# Allegro board AX615D_DEMO_V1_3.BRD
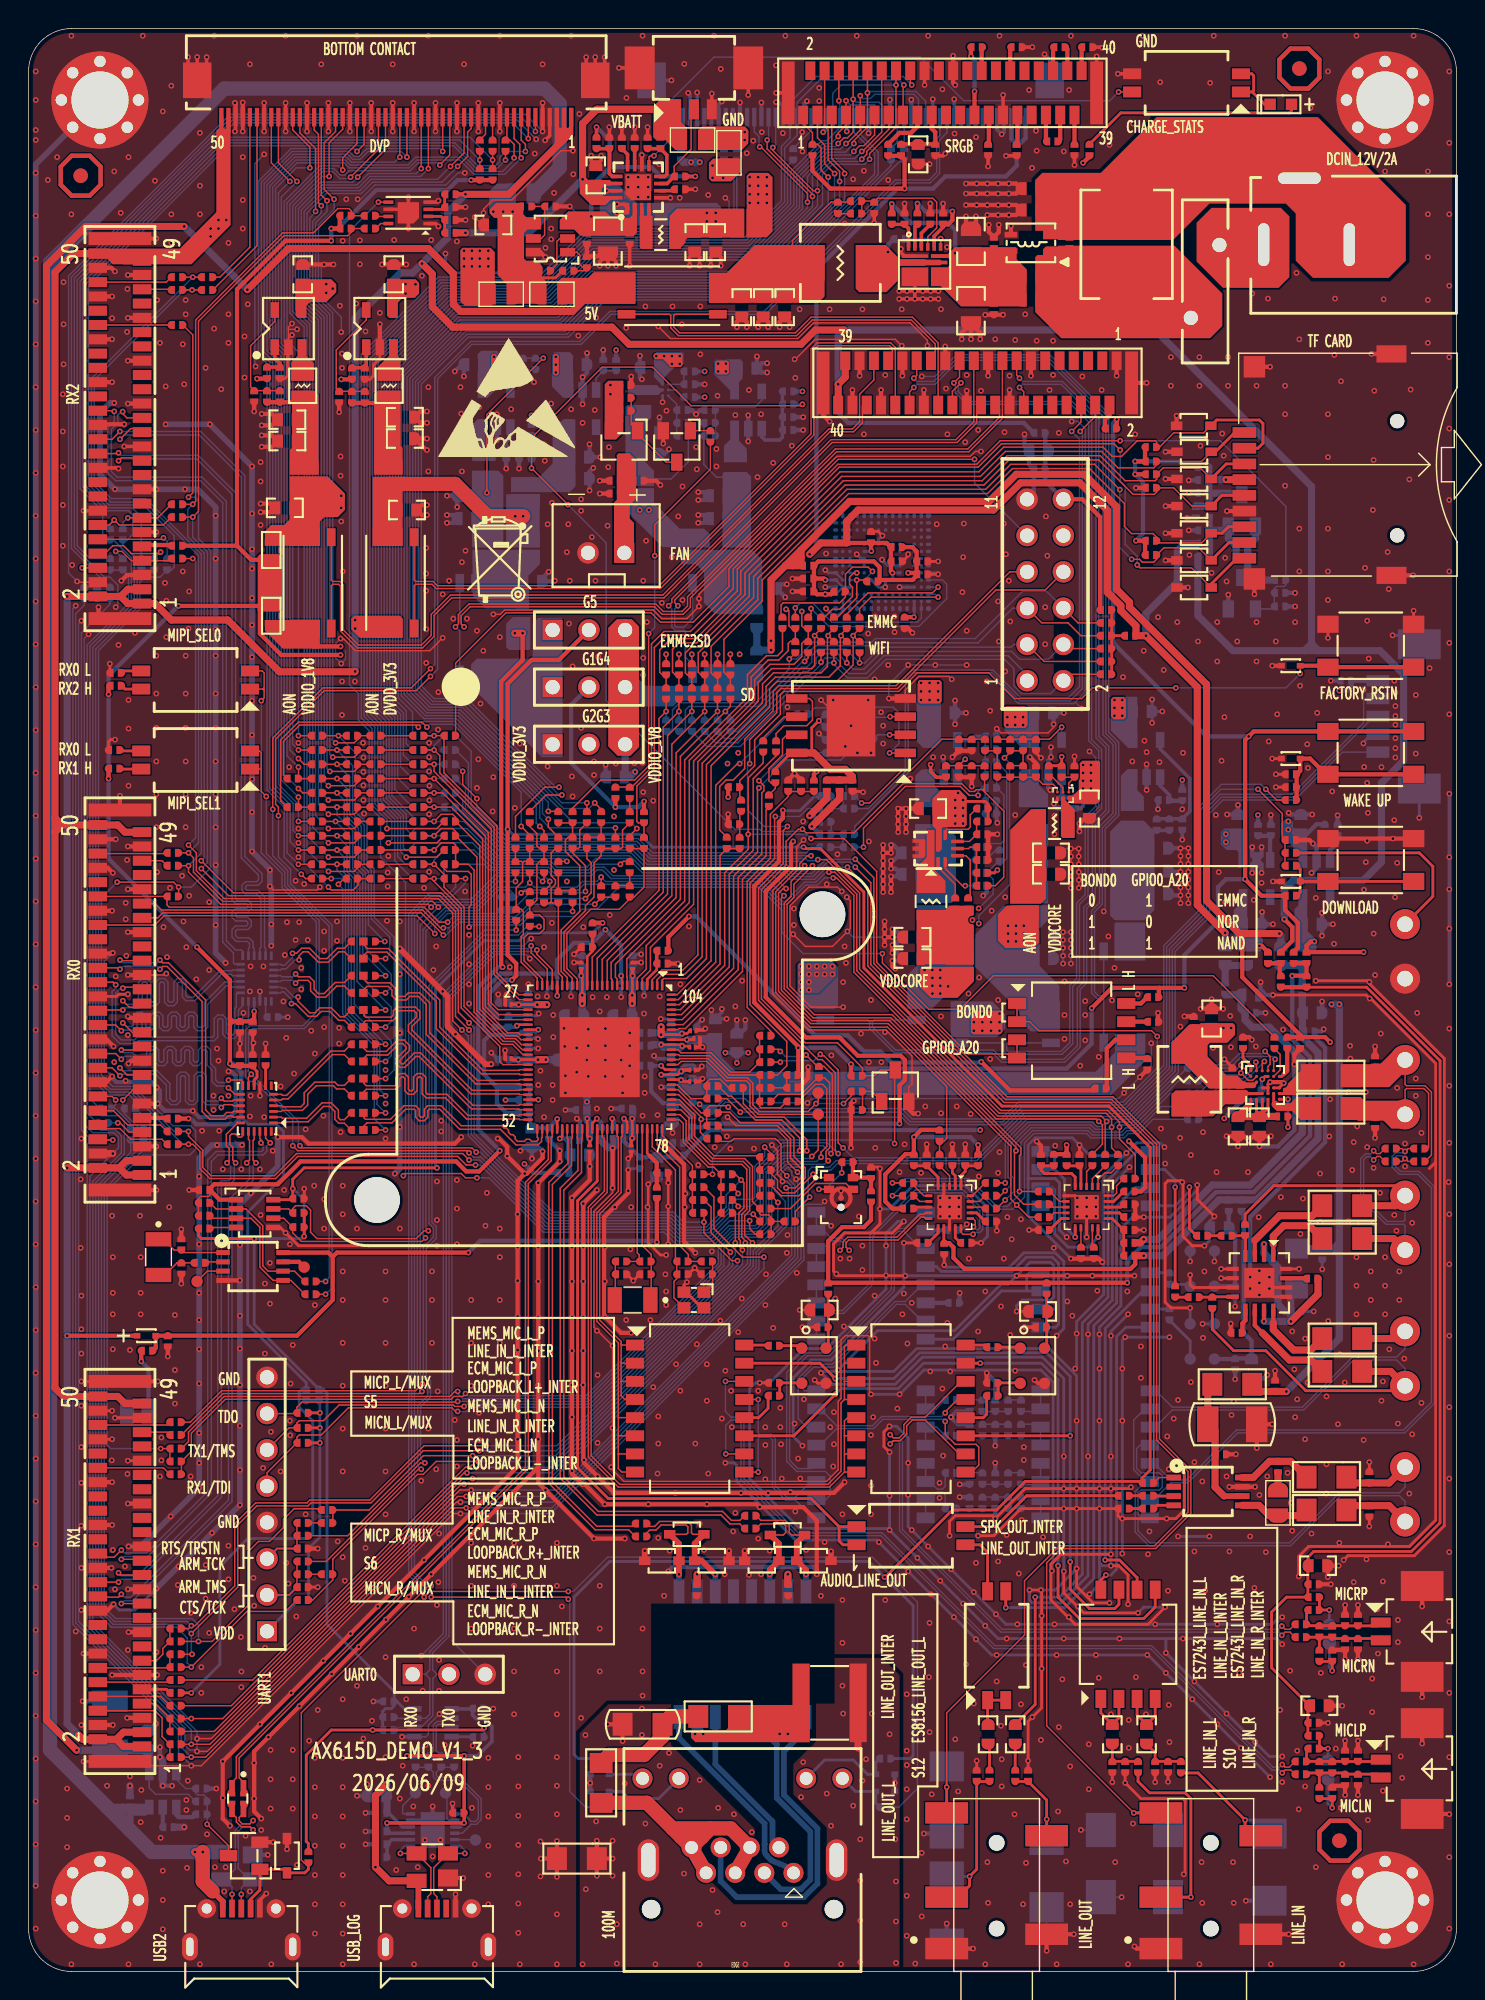
[diagram p0: board, top side]
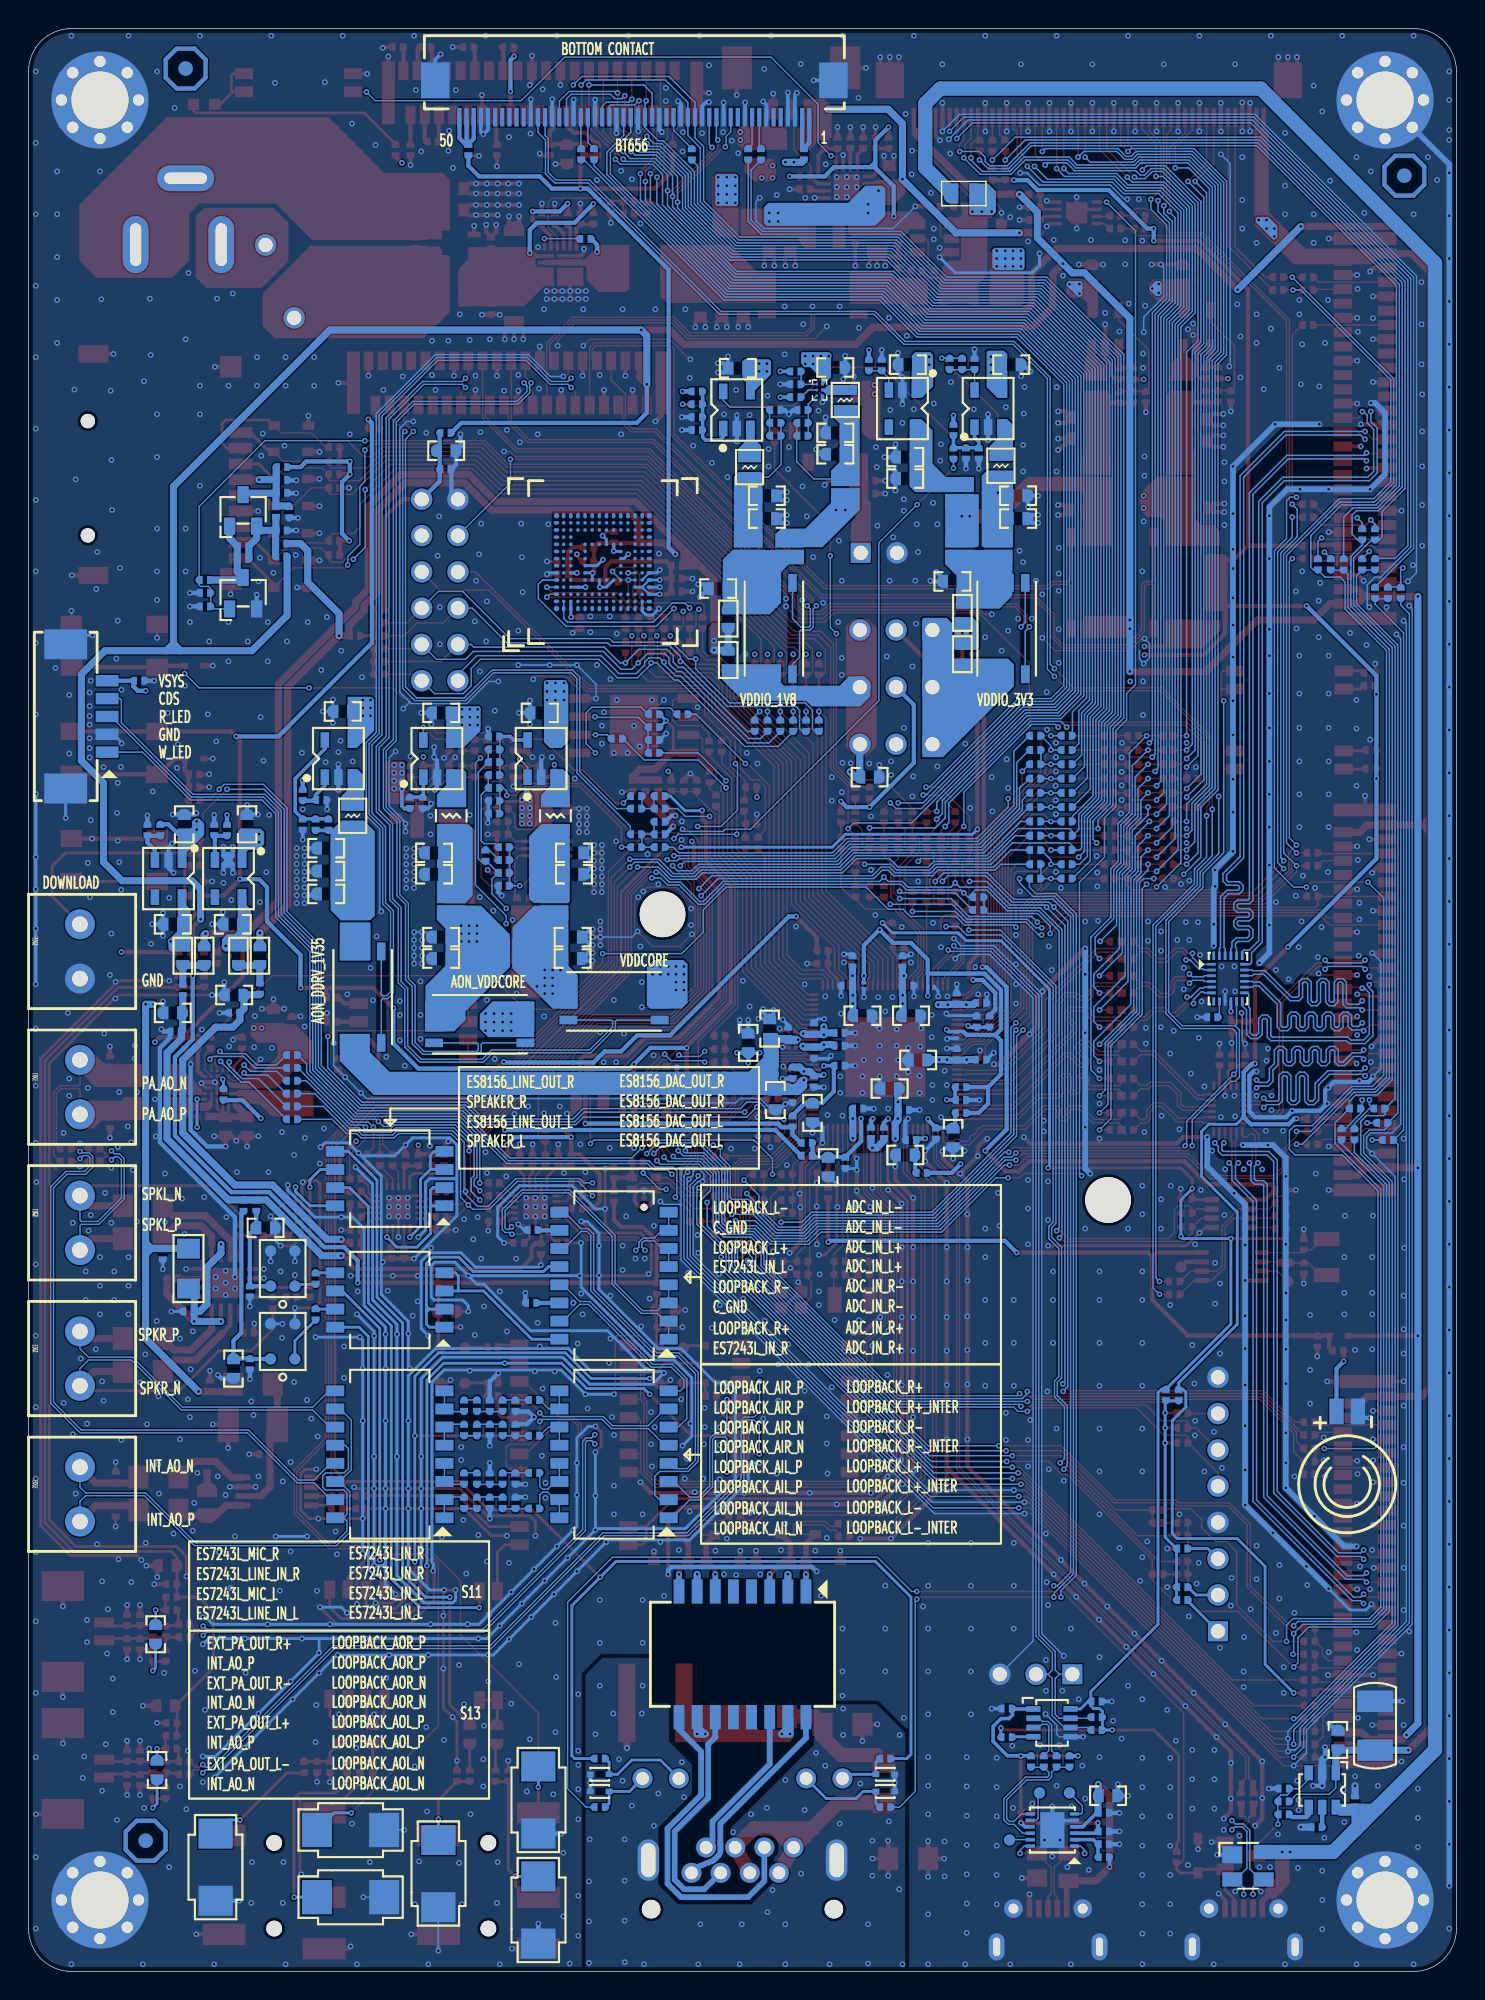
[diagram p1: board, bottom side, seen from below]

Outline 100 x 136 mm; copper layers: TOP, L2, L3, BOTTOM. Coordinates in mm from the lower left corner of the outline.
Outline path: 0,133 0,3 arc(0.88,0.88) 3,0 97,0 arc(99.12,0.88) 100,3 100,133 arc(99.12,135.12) 97,136 3,136 arc(0.88,135.12) 0,133

## Design rules (mm)
constraint set DEFAULT: min track width 0.1, pair gap 0.1
net group ADC_IN_L: nets ADC_IN_L+ ADC_IN_L-
net group ADC_IN_R: nets ADC_IN_R+ ADC_IN_R-
net group CH0_AON_VDDIO_1V8_V: nets CH0_AON_VDDIO_1V8_V+ CH0_AON_VDDIO_1V8_V-
net group CH1_AON_VDDIO_3V3_V: nets CH1_AON_VDDIO_3V3_V+ CH1_AON_VDDIO_3V3_V-
net group CH2_AON_DDRV_1V35_V: nets CH2_AON_DDRV_1V35_1V5_V+ CH2_AON_DDRV_1V35_1V5_V-
net group CH3_DVDD_MAIN_V: nets CH3_DVDD_MAIN_V+ CH3_DVDD_MAIN_V-
net group CH4_AON_VDDCORE_V: nets CH4_AON_VDDCORE_V+ CH4_AON_VDDCORE_V-
net group CH5_VDDIO_1V8_V: nets CH5_VDDIO_1V8_V+ CH5_VDDIO_1V8_V-
net group CH6_VDDIO_3V3_V: nets CH6_VDDIO_3V3_V+ CH6_VDDIO_3V3_V-
net group CH7_VDDCORE_V: nets CH7_VDDCORE_V+ CH7_VDDCORE_V-
net group DP5: nets USB_DM USB_DP
net group DP6: nets USB_DM_J USB_DP_J
net group DP7: nets USB_LOG_DM USB_LOG_DP
net group DRX: nets DRX+ DRX-
net group DTX: nets DTX+ DTX-
net group ECM_MIC_L: nets ECM_MIC_L_N ECM_MIC_L_P
net group ECM_MIC_R: nets ECM_MIC_R_N ECM_MIC_R_P
net group EPHY_RXN: nets EPHY_RXN N30393159
net group EPHY_RXP: nets EPHY_RXP N30393142
net group EPHY_TXN: nets EPHY_TXN N30393097
net group EPHY_TXP: nets EPHY_TXP N30393080
net group EXT_PA_OUT_L: nets EXT_PA_OUT_L+ EXT_PA_OUT_L-
net group EXT_PA_OUT_R: nets EXT_PA_OUT_R+ EXT_PA_OUT_R-
net group INT_AO: nets INT_AO_N INT_AO_P
net group LOOPBACK_AIL: nets LOOPBACK_AIL_N LOOPBACK_AIL_P
net group LOOPBACK_AIR: nets LOOPBACK_AIR_N LOOPBACK_AIR_P
net group LOOPBACK_AOL: nets LOOPBACK_AOL_N LOOPBACK_AOL_P
net group LOOPBACK_AOR: nets LOOPBACK_AOR_N LOOPBACK_AOR_P
net group LOOPBACK_L: nets LOOPBACK_L+ LOOPBACK_L-
net group LOOPBACK_L_INTER: nets LOOPBACK_L+_INTER LOOPBACK_L-_INTER
net group LOOPBACK_R: nets LOOPBACK_R+ LOOPBACK_R-
net group LOOPBACK_R_INTER: nets LOOPBACK_R+_INTER LOOPBACK_R-_INTER
net group MEMS_MIC_L: nets MEMS_MIC_L_N MEMS_MIC_L_P
net group MEMS_MIC_R: nets MEMS_MIC_R_N MEMS_MIC_R_P
net group MIPI_RX_CD0: nets MIPI_RX_CD0_N MIPI_RX_CD0_P
net group MIPI_RX_CD1: nets MIPI_RX_CD1_N MIPI_RX_CD1_P
net group MIPI_RX_CD2: nets MIPI_RX_CD2_N MIPI_RX_CD2_P
net group MIPI_RX_CD3: nets MIPI_RX_CD3_N MIPI_RX_CD3_P
net group MIPI_RX_CD4: nets MIPI_RX_CD4_N MIPI_RX_CD4_P
net group MIPI_RX_CD5: nets MIPI_RX_CD5_N MIPI_RX_CD5_P
net group SMART_PA_AO: nets SMART_PA_AO_N SMART_PA_AO_P
net group USB_LOG: nets USB_LOG_RXD USB_LOG_TXD
net group MG1: nets RX_CD0_N RX_CD0_P RX_CD1_N RX_CD1_P RX_CD2_N RX_CD2_P RX_CD3_N RX_CD3_P RX_CD4_N RX_CD4_P RX_CD5_N RX_CD5_P
net group MG2: nets MIPI_2LANE_CD0_N MIPI_2LANE_CD0_P MIPI_2LANE_CD1_N MIPI_2LANE_CD1_P MIPI_2LANE_CLK0_N MIPI_2LANE_CLK0_P
net group MG3: nets MIPI_2X2LANE_CLK_N MIPI_2X2LANE_CLK_P MIPI_4LANE/2LANE_CD0_N MIPI_4LANE/2LANE_CD0_P MIPI_4LANE/2LANE_CD1_N MIPI_4LANE/2LANE_CD1_P MIPI_4LANE/2LANE_CLK_N MIPI_4LANE/2LANE_CLK_P MIPI_4LANE_CD2_N MIPI_4LANE_CD2_P MIPI_4LANE_CD3_N MIPI_4LANE_CD3_P
net group MG4: nets MIPI_2LANE_CD2_N MIPI_2LANE_CD2_P MIPI_2LANE_CD3_N MIPI_2LANE_CD3_P MIPI_2LANE_CLK1_N MIPI_2LANE_CLK1_P

## Placement (name value [footprint] x y rotation side)
C3  1uF/10V  [C0402S]  44.4 55.9 0 top
C4  18pF/50V  [C0402S]  43.2 48.8 0 top
C5  12pF/50V  [C0402S]  47.5 48.8 0 top
C6  1uF/10V  [C0402S]  9.75 44.1 270 top
C7  18pF/50V  [C0402S]  41.5 48.8 180 top
C8  12pF/50V  [C0402S]  45.8 48.8 180 top
C9  18pF/50V  [C0402S]  10.7 50.9 270 top
C11  18pF/50V  [C0402S]  10.7 49.2 90 top
C12  1uF/10V  [C0402S]  88.4 83.8 180 top
C13  100nF/16V  [C0402S]  12.3 54.7 180 top
C14  100nF/16V  [C0402S]  18.9 54.1 0 top
C15  1uF/10V  [C0402S]  88.4 79.2 0 top
C16  1uF/10V  [C0402S]  39.1 71.7 180 top
C18  2.2uF/6.3V  [C0402S]  82.28 100.88 180 bottom
C19  100nF/16V  [C0402S]  84.97 99.78 0 bottom
C21  2.2uF/6.3V  [C0402S]  82.25 103.5 180 bottom
C24  100nF/16V  [C0402S]  82.25 104.4 180 bottom
C25  100nF/16V  [C0402S]  87.65 95.55 0 bottom
C26  NC/10pF/50V  [C0402S]  78.6 103.85 180 top
C28  2.2uF/6.3V  [C0402S]  57.7 83 270 top
C29  1uF/10V  [C0402S]  44.4 70.55 0 top
C30  100nF/16V  [C0402S]  62.6 97.8 0 top
C31  100nF/16V  [C0402S]  54.6 96.6 180 top
C32  100nF/16V  [C0402S]  54.6 97.5 180 top
C33  2.2uF/6.3V  [C0402S]  62.6 98.7 0 top
C34  100nF/16V  [C0402S]  59 100.4 90 top
C35  2.2uF/6.3V  [C0402S]  60.8 98.7 0 top
C36  1uF/10V  [C0402S]  61.35 94.4 270 top
C39  NC/100uF/10V  [C1210]  5.7 17.2 90 bottom
C40  10uF/10V  [C0603S]  8.3 16.2 90 bottom
C41  1uF/10V  [C0402S]  7.1 11.9 90 bottom
C42  1uF/10V  [C0402S]  12.1 12.8 0 bottom
C43  100nF/16V  [C0402S]  38.2 58.2 0 bottom
C44  10uF/10V  [C0603S]  38.6 57.15 0 bottom
C45  100nF/16V  [C0402S]  36.45 58.65 270 bottom
C46  10uF/10V  [C0603S]  35.25 58.35 270 bottom
C50  10nF/50V  [C0402S]  46.8 26.7 270 top
C51  10nF/50V  [C0402S]  53.2 26.7 270 top
C53  1uF/10V  [C0402S]  33.6 66.5 90 bottom
C54  1uF/10V  [C0402S]  34.7 61 180 bottom
C55  100nF/16V  [C0402S]  14.8 63.8 90 top
C56  10nF/50V  [C0402S]  15.7 63.8 90 top
C57  100nF/16V  [C0402S]  15.7 66.1 270 top
C58  10nF/50V  [C0402S]  14.8 66.1 270 top
C59  1uF/25V  [C0402S]  74.15 134.7 0 top
C60  1uF/25V  [C0402S]  73.25 127.5 270 top
C61  1uF/25V  [C0402S]  72.2 134.7 180 top
C62  1uF/25V  [C0402S]  71.7 128.1 180 top
C63  1uF/25V  [C0402S]  69.2 127.5 270 top
C64  1uF/25V  [C0402S]  69.2 134.7 0 top
C65  1uF/25V  [C0402S]  67.2 127.5 270 top
C66  1uF/25V  [C0402S]  66.4 134.7 180 top
C67  10uF/10V  [C0603S]  62.3 127.2 270 top
C68  100nF/16V  [C0402S]  63.5 127.5 270 top
C69  10uF/10V  [C0603S]  55.4 46.3 180 top
C70  100nF/16V  [C0402S]  55.6 45.1 180 top
C71  1uF/10V  [C0402S]  52.2 43.8 180 top
C72  1uF/10V  [C0402S]  52.2 40.3 180 top
C73  100nF/16V  [C0402S]  41 58.7 270 bottom
C74  10uF/10V  [C0603S]  44 56.3 270 bottom
C75  100nF/16V  [C0402S]  42.8 56.6 270 bottom
C76  4.7uF/6.3V  [C0402S]  40.1 58.7 270 bottom
C77  10uF/10V  [C0603S]  70.7 46.2 180 top
C78  100nF/16V  [C0402S]  70.9 45.1 180 top
C79  1uF/10V  [C0402S]  67.5 43.7 180 top
C80  1uF/10V  [C0402S]  67.5 40.3 180 top
C81  10uF/10V  [C0603S]  90.4 18.6 0 top
C82  100nF/16V  [C0402S]  90 17.4 0 top
C83  10uF/10V  [C0603S]  90.3 28.4 0 top
C84  100nF/16V  [C0402S]  90 27.1 0 top
C85  10uF/10V  [C0603S]  91 14.1 270 bottom
C86  10uF/10V  [C0603S]  91.1 23.6 270 bottom
C87  1uF/10V  [C0402S]  89.1 14.7 180 top
C88  NC/220pF/50V  [C0402S]  90.4 14.3 270 top
C89  1uF/10V  [C0402S]  89.1 24.3 180 top
C90  NC/220pF/50V  [C0402S]  90.4 23.8 270 top
C91  1uF/10V  [C0402S]  89.1 23.4 180 top
C92  1uF/10V  [C0402S]  89.1 13.8 180 top
C93  33pF/50V/C0G  [C0402S]  92.2 24.6 90 top
C94  33pF/50V/C0G  [C0402S]  92.2 22.9 270 top
C95  33pF/50V/C0G  [C0402S]  92.2 15.1 90 top
C96  33pF/50V/C0G  [C0402S]  92.2 13.4 270 top
C97  1uF/10V  [C0402S]  87.3 41 90 top
C98  100uF/10V  [C1210]  84.3 38.3 0 top
C99  1uF/10V  [C0402S]  83.5 36.2 0 top
C100  100nF/16V  [C0402S]  59 55.9 90 top
C101  100nF/16V  [C0402S]  76.7 33.3 0 top
C102  NC/1nF/50V  [C0402S]  93.9 32.2 270 top
C103  100nF/16V  [C0402S]  76.7 32.4 0 top
C104  NC/1nF/50V  [C0402S]  87.5 35.3 90 top
C105  NC/1nF/50V  [C0402S]  93.9 34.6 90 top
C106  1uF/10V  [C0402S]  65.6 56.8 90 top
C107  1uF/10V  [C0402S]  64.12 50.58 270 top
C108  100nF/16V  [C0402S]  89.7 65.8 0 bottom
C109  10uF/10V  [C0603S]  89.9 67.1 0 bottom
C110  1uF/10V  [C0402S]  62.9 56.8 90 top
C111  1uF/10V  [C0402S]  64.8 46.8 180 bottom
C112  1uF/10V  [C0402S]  64.7 51.9 180 bottom
C113  100nF/16V  [C0402S]  85.6 67.1 0 bottom
C114  1uF/10V  [C0402S]  62.6 51 0 top
C115  10uF/10V  [C0603S]  85.6 68.35 0 bottom
C116  1uF/10V  [C0402S]  65.67 51 180 top
C117  22uF/10V  [C0603S]  89.1 80.3 90 bottom
C118  22uF/10V  [C0603S]  89.9 73.3 0 bottom
C119  100nF/16V  [C0402S]  91.67 79.9 90 bottom
C120  1uF/10V  [C0402S]  70.9 56.8 90 top
C121  1uF/10V  [C0402S]  77.1 51.9 0 top
C122  22uF/10V  [C0603S]  84.7 80.3 90 bottom
C123  1uF/10V  [C0402S]  73.6 56.8 90 top
C124  22uF/10V  [C0603S]  85.7 73.3 0 bottom
C125  NC/1uF/10V  [C0402S]  74.6 50.3 90 top
C126  100nF/16V  [C0402S]  87 79.9 90 bottom
C127  NC/1uF/10V  [C0402S]  73.7 50.3 90 top
C128  NC/1uF/10V  [C0402S]  71.1 51.9 0 top
C129  1uF/10V  [C0402S]  77.1 52.8 180 top
C130  1uF/10V  [C0402S]  77.1 53.7 180 top
C131  10uF/10V  [C0603S]  75.9 16.6 90 top
C132  10uF/10V  [C0603S]  78.3 16.6 90 top
C133  10uF/10V  [C0603S]  85.65 42.2 270 bottom
C134  100nF/16V  [C0402S]  84.5 42.5 270 bottom
C135  1uF/10V  [C0402S]  79.9 46 90 bottom
C136  10nF/50V  [C0402S]  78.9 14.3 270 top
C137  10nF/50V  [C0402S]  75.9 14.3 270 top
C138  100nF/16V  [C0402S]  84.5 47.6 270 bottom
C139  10uF/10V  [C0603S]  83.4 52.05 180 bottom
C140  1uF/10V  [C0402S]  79.9 48.5 90 bottom
C141  22uF/10V  [C0603S]  67.2 16.6 270 top
C142  22uF/10V  [C0603S]  69.1 16.6 270 top
C143  1uF/10V  [C0402S]  90.6 50.2 270 bottom
C144  1uF/10V  [C0402S]  88.8 46.2 0 bottom
C145  220nF/10V  [C0402S]  82.2 51.5 180 top
C146  1uF/10V  [C0402S]  84.6 44.7 180 top
C147  220nF/10V  [C0402S]  80.3 47.6 90 top
C148  1uF/10V  [C0402S]  69.5 32.8 90 bottom
C149  1uF/10V  [C0402S]  64.6 32.4 0 bottom
C150  10nF/50V  [C0402S]  67.7 32.8 270 bottom
C151  10nF/50V  [C0402S]  67.7 34.5 270 bottom
C152  1uF/10V  [C0402S]  69.5 34.5 270 bottom
C153  1uF/10V  [C0402S]  64.6 34.9 0 bottom
C154  1uF/10V  [C0402S]  69.5 37.9 90 bottom
C155  1uF/10V  [C0402S]  64.6 37.5 0 bottom
C156  10nF/50V  [C0402S]  67.7 37.9 270 bottom
C157  10nF/50V  [C0402S]  67.7 39.6 270 bottom
C158  1uF/10V  [C0402S]  69.5 39.6 90 bottom
C159  1uF/10V  [C0402S]  64.6 40 0 bottom
C160  10uF/10V  [C0603S]  24.4 12.3 180 bottom
C161  100nF/16V  [C0402S]  24.7 11.1 180 bottom
C162  100nF/16V  [C0402S]  30.1 11.1 180 top
C163  100nF/16V  [C0402S]  31.5 18.4 0 bottom
C164  100nF/16V  [C0402S]  25.2 18.9 180 bottom
C165  100nF/16V  [C0402S]  24.7 9.8 180 bottom
C166  100nF/16V  [C0402S]  24.7 8.9 180 bottom
C167  2.2uF/6.3V  [C0402S]  41.8 111.05 0 top
C168  100nF/16V  [C0402S]  41.8 109.25 0 top
C169  2.2uF/6.3V  [C0402S]  41.05 103.45 180 top
C170  100nF/16V  [C0402S]  42.73 104.35 0 top
C171  100nF/50V  [C0402S]  72.9 121 90 top
C172  100nF/50V  [C0402S]  67.6 121 90 top
C173  22uF/25V  [C0805S]  66 121.1 90 top
C174  22uF/25V  [C0805S]  66 116.25 270 top
C175  100nF/50V  [C0402S]  67.6 116.38 270 top
C176  100nF/50V  [C0402S]  61 121.28 180 bottom
C177  22uF/10V  [C0603S]  52.95 116.5 270 top
C178  22uF/10V  [C0603S]  51.45 116.5 270 top
C179  22uF/10V  [C0603S]  49.95 116.5 270 top
C180  2nF/50V  [C0402S]  57.95 123.05 180 top
C181  100nF/50V  [C0402S]  61.35 122.7 90 top
C182  2.2uF/6.3V  [C0402S]  64.05 122.7 90 top
C183  100pF/50V  [C0402S]  16.7 110.25 90 top
C184  22uF/10V  [C0603S]  19.2 118.8 90 top
C185  22uF/10V  [C0603S]  18.12 108.62 180 top
C186  NC/22uF/10V  [C0603S]  18.12 107.12 180 top
C187  NC/22uF/10V  [C0603S]  17.95 102.45 180 top
C188  22uF/10V  [C0603S]  26.35 108.8 0 top
C189  NC/22uF/10V  [C0603S]  26.35 107.3 0 top
C190  NC/22uF/10V  [C0603S]  26.5 102.3 0 top
C191  22uF/10V  [C0603S]  25.57 118.8 90 top
C192  100pF/50V  [C0402S]  22.65 110.2 90 top
C193  NC/100nF/16V  [C0402S]  17.6 111.9 270 top
C194  100nF/16V  [C0402S]  23.55 111.85 270 top
C200  22uF/10V  [C0603S]  78 88.2 0 bottom
C201  22pF/50V  [C0402S]  79 80.28 90 bottom
C202  22uF/10V  [C0603S]  79.15 75.42 0 bottom
C203  22uF/10V  [C0603S]  79.15 78.62 0 bottom
C204  22uF/10V  [C0603S]  79.15 77.03 0 bottom
C210  220nF/10V  [C0402S]  79.5 82 180 bottom
C212  22uF/10V  [C0603S]  71.1 88.1 0 bottom
C213  220pF/50V  [C0402S]  68.75 85.85 270 top
C214  22uF/10V  [C0603S]  71.6 78.3 0 bottom
C215  22uF/10V  [C0603S]  71.1 72.4 0 bottom
C216  22uF/10V  [C0603S]  71.6 76.8 0 bottom
C217  22uF/10V  [C0603S]  71.1 70.9 0 bottom
C218  100nF/16V  [C0402S]  72.4 81.8 270 bottom
C219  100nF/16V  [C0402S]  66.05 85.85 270 top
C225  22uF/10V  [C0603S]  50.33 112.22 0 bottom
C226  NC/22uF/10V  [C0603S]  48.3 103.3 180 bottom
C227  100pF/50V  [C0402S]  47.7 107.5 0 bottom
C228  22uF/10V  [C0603S]  31.18 112.47 180 bottom
C229  22uF/10V  [C0603S]  48.3 101.7 180 bottom
C230  22uF/10V  [C0603S]  30.7 103.3 180 bottom
C231  NC/22uF/10V  [C0603S]  30.7 101.7 180 bottom
C232  NC/22uF/10V  [C0603S]  35.3 97.3 0 bottom
C233  NC/22uF/10V  [C0603S]  51.7 96.8 0 bottom
C234  100pF/50V  [C0402S]  35.5 112.53 270 bottom
C235  22nF/50V  [C0402S]  33.45 106.25 270 bottom
C236  NC/22nF/50V  [C0402S]  53.2 107.9 0 bottom
C242  22uF/10V  [C0603S]  64.2 88.1 0 bottom
C243  220pF/50V  [C0402S]  67.4 84.65 0 bottom
C244  100nF/16V  [C0402S]  67.4 81.95 0 bottom
C245  22uF/10V  [C0603S]  61.8 76.8 180 bottom
C246  22uF/10V  [C0603S]  61.8 78.3 180 bottom
C247  22uF/10V  [C0603S]  61.9 72.4 180 bottom
C248  22uF/10V  [C0603S]  61.9 70.9 180 bottom
C249  47nF/50V  [C0402S]  66.05 84 270 top
C251  22uF/25V  [C0805S]  40.58 121.12 270 top
C252  100nF/16V  [C0402S]  42.1 121.3 270 top
C253  10uF/10V  [C0603S]  48.12 121.05 270 top
C254  10uF/10V  [C0603S]  46.65 121.05 270 top
C255  10uF/10V  [C0603S]  39.73 125.72 270 top
C256  100nF/16V  [C0402S]  53.2 83 90 top
C257  NC/10uF/10V  [C0603S]  39.7 61.8 0 bottom
C260  1uF/10V  [C0402S]  89.05 65 270 top
C261  1uF/10V  [C0402S]  84.3 62.85 90 top
C262  100nF/16V  [C0402S]  81.6 66.45 90 top
C263  10uF/10V  [C0603S]  82.85 66.7 90 top
C264  1uF/10V  [C0402S]  85.05 65 90 top
C265  22nF/50V  [C0402S]  87.8 59.85 180 top
C266  10uF/25V  [C0603S]  84.7 59.15 270 top
C267  10uF/25V  [C0603S]  86.2 59.15 270 top
C268  NC/1nF/50V  [C0402S]  94.3 59.4 270 top
C269  1uF/10V  [C0402S]  92.25 90.35 180 bottom
C415  10uF/10V  [C0603S]  70.75 106.45 180 bottom
C440  100nF/16V  [C0402S]  70.8 105.15 180 bottom
C502  2.2uF/6.3V  [C0402S]  46.5 61.2 270 bottom
C503  2.2uF/6.3V  [C0402S]  46.8 65.7 90 bottom
C510  NC/2.2uF/6.3V  [C0402S]  43.2 64.8 180 bottom
C531  NC/2.2uF/6.3V  [C0402S]  45 62.3 270 bottom
C556  NC/10uF/10V  [C0603S]  45.1 60.1 270 bottom
C557  2.2uF/6.3V  [C0402S]  43.2 63.4 180 bottom
C559  1uF/6.3V  [C0201S]  36.8 68.9 180 bottom
C560  1uF/6.3V  [C0201S]  41.5 69 270 bottom
C561  1uF/6.3V  [C0201S]  35 65.55 270 bottom
C562  1000pF/2KV  [C1206]  43 17.3 180 top
C563  22uF/10V  [C0603S]  38.42 112.47 0 bottom
C564  22uF/10V  [C0603S]  38.6 106 0 bottom
C565  NC/22uF/10V  [C0603S]  38.6 104.5 0 bottom
C567  100nF/16V  [C0402S]  40.25 112.45 90 bottom
C573  10pF/50V  [C0402S]  93.1 15.1 90 top
C574  10pF/50V  [C0402S]  93.1 13.4 270 top
C575  10pF/50V  [C0402S]  93.1 24.6 90 top
C576  10pF/50V  [C0402S]  93.1 22.9 270 top
C577  NC/2.2uF/6.3V  [C0402S]  41.9 60.4 180 bottom
C580  1uF/10V  [C0402S]  49.4 80.3 180 top
C581  10uF/10V  [C0603S]  37.7 63.8 0 bottom
C582  NC/10uF/10V  [C0603S]  41.6 66.9 180 bottom
C583  NC/2.2uF/6.3V  [C0402S]  38.7 60.3 180 bottom
C584  NC/2.2uF/6.3V  [C0402S]  33.3 63.83 180 bottom
C585  NC/2.2uF/6.3V  [C0402S]  33.3 67.8 180 bottom
C586  NC/2.2uF/6.3V  [C0402S]  43.2 65.7 180 bottom
C587  NC/2.2uF/6.3V  [C0402S]  42.3 70.7 90 bottom
C588  NC/2.2uF/6.3V  [C0402S]  38.8 70.7 90 bottom
C589  NC/10uF/10V  [C0603S]  41.1 83.6 180 bottom
C590  1uF/10V  [C0402S]  29.55 122.6 0 top
C591  1uF/10V  [C0402S]  29.55 123.5 0 top
C592  22uF/10V  [C0603S]  43.5 112.28 180 bottom
C593  10pF/50V  [C0402S]  45.8 107.5 180 bottom
C594  22uF/10V  [C0603S]  43.5 107.7 0 bottom
C595  NC/22uF/10V  [C0603S]  43.5 106.2 0 bottom
C596  22uF/10V  [C0603S]  74.3 81.4 270 top
C597  10pF/50V  [C0402S]  69.65 84 270 top
C598  22uF/10V  [C0603S]  71.6 78.3 0 top
C599  NC/22uF/10V  [C0603S]  71.6 76.8 0 top
C600  22uF/10V  [C0603S]  63 81.4 180 top
C601  47nF/50V  [C0402S]  66.8 78.7 0 top
C602  22uF/10V  [C0603S]  61.9 72.4 180 top
C603  22uF/10V  [C0603S]  61.9 70.9 180 top
C604  NC/22pF/50V  [C0402S]  65.8 74.75 270 top
C605  220pF/50V  [C0402S]  68 78.1 270 bottom
C606  NC/100nF/16V  [C0402S]  46.3 111.1 0 bottom
C607  100nF/16V  [C0402S]  73.25 84 90 top
C608  NC/10uF/10V  [C0603S]  38.2 66.9 180 bottom
C609  NC/10uF/10V  [C0603S]  47.7 61 270 bottom
C610  NC/10uF/10V  [C0603S]  48.1 66 90 bottom
C611  NC/1uF/6.3V  [C0201S]  46.5 62.3 0 top
C612  NC/1uF/6.3V  [C0201S]  46.8 65.3 0 top
C613  1uF/6.3V  [C0201S]  38.7 70.4 90 top
C614  1uF/6.3V  [C0201S]  42.3 70.4 90 top
C615  1uF/6.3V  [C0201S]  33.6 67.7 180 top
C616  1uF/6.3V  [C0201S]  33.6 63.9 180 top
C617  1uF/6.3V  [C0201S]  46.55 65.85 0 top
C618  1uF/6.3V  [C0201S]  39.3 57.6 270 top
C619  1uF/6.3V  [C0201S]  42.2 57.6 270 top
C620  NC/2.2uF/6.3V  [C0402S]  45 66 90 bottom
C621  NC/2.2uF/6.3V  [C0402S]  35 64.2 90 bottom
C622  NC/2.2uF/6.3V  [C0402S]  35 68.1 90 bottom
C623  2.2uF/6.3V  [C0402S]  42.7 69 0 bottom
C624  2.2uF/6.3V  [C0402S]  38.4 69 180 bottom
C625  1uF/6.3V  [C0201S]  46.5 64.7 0 top
C626  1uF/6.3V  [C0201S]  46.5 63.1 0 top
C627  NC/10uF/10V  [C0603S]  49.6 65 90 bottom
C628  2.2uF/6.3V  [C0402S]  45 64.3 270 bottom
C629  2.2uF/6.3V  [C0402S]  46.5 62.9 270 bottom
C639  NC/1nF/50V  [C0402S]  94.3 63.7 90 top
C640  1uF/10V  [C0402S]  39.1 121.3 270 top
C641  10uF/10V  [C0603S]  32.55 122.25 180 top
C642  1uF/10V  [C0402S]  36.55 123.55 0 top
D1  RB520S30T1G  [SOD_523]  8.25 44.5 180 top
D3  WS05D5-B  [SOD_523B]  88.4 84.9 0 top
D4  WS05D5-B  [SOD_523B]  88.4 76.3 0 top
D5  WS05DLC-B  [SOD_323B]  81.62 106.38 180 top
D6  WS05DLC-B  [SOD_323B]  81.6 108.2 180 top
D7  WS05DLC-B  [SOD_323B]  81.62 104.47 180 top
D8  WS05DLC-B  [SOD_323B]  81.62 102.58 180 top
D9  WS05DLC-B  [SOD_323B]  81.62 100.67 180 top
D10  WS05DLC-B  [SOD_323B]  81.62 98.78 180 top
D11  WS05DLC-B  [SOD_323B]  81.62 96.88 180 top
D12  WS05RXLC  [SOT_143]  14.6 7.4 270 bottom
D13  WS05DLC-B  [SOD_323B]  18.1 8.1 270 top
D16  WS03DLC-B  [SOD_323B]  46.1 30.6 180 top
D17  WS03DLC-B  [SOD_323B]  53.15 30.55 180 top
D19  WS05D5-B  [SOD_523B]  60 13.8 0 bottom
D20  WS05D5-B  [SOD_523B]  40 13.8 180 bottom
D21  WS05D5-B  [SOD_523B]  60 12.6 0 bottom
D22  WS05D5-B  [SOD_523B]  40 12.6 180 bottom
D23  WS6.5P6SMB-B  [DO_214AAB]  77.45 9.9 180 bottom
D24  WS6.5P6SMB-B  [DO_214AAB]  77.45 5.2 180 bottom
D25  WS6.5P6SMB-B  [DO_214AAB]  86.9 7.3 270 bottom
D26  WS6.5P6SMB-B  [DO_214AAB]  64.3 12 90 bottom
D27  WS6.5P6SMB-B  [DO_214AAB]  64.3 4.3 90 bottom
D28  WS6.5P6SMB-B  [DO_214AAB]  71.3 6.85 90 bottom
D29  WS05RXLC  [SOT_143]  28.27 7.3 90 top
D30  WS15P30SMC-B  [DO_214ABB]  76.9 120.9 90 top
D31  Red  [LED0603]  87.7 130.7 0 top
D33  SMD5050-090NA  [SMD5050-XXXNA]  56.1 18.8 0 top
D34  WS05D5-B  [SOD_523B]  88.4 91.4 0 top
D35  WS03DLC-B  [SOD_323B]  47.85 28.75 180 top
D36  WS03DLC-B  [SOD_323B]  44.35 28.75 0 top
D37  WS03DLC-B  [SOD_323B]  51.35 28.75 180 top
D38  WS03DLC-B  [SOD_323B]  55 28.75 0 top
FB3  PZ1005U601-R45TF  [L0402S]  37.45 55.9 0 bottom
FB4  PZ1005U601-R45TF  [L0402S]  34.7 60.1 0 bottom
FB6  PZ3216U221-2R0TF  [FB1206]  84.3 41.1 0 top
FB7  PZ3216U221-2R0TF  [FB1206]  90.9 32.3 0 top
FB8  PZ3216U221-2R0TF  [FB1206]  90.9 34.6 0 top
FB9  PZ1005E221-R60TF  [L0402S]  89.2 68.7 270 bottom
FB10  PZ1005E221-R60TF  [L0402S]  83.8 68.8 270 bottom
FB12  PZ3216U221-2R0TF  [FB1206]  92 53.6 0 top
FB13  PZ3216U221-2R0TF  [FB1206]  92 51.3 0 top
FB14  PZ3216U221-2R0TF  [FB1206]  92 44.3 0 top
FB15  PZ3216U221-2R0TF  [FB1206]  92 42 0 top
FB16  PZ1608D300-3R0TF  [L0603S]  70.2 117 180 top
FB17  PZ1608D300-3R0TF  [L0603S]  70.2 118.6 180 top
FB18  PZ1608D300-3R0TF  [L0603S]  70.2 123.3 180 top
FB19  PZ1608D300-3R0TF  [L0603S]  70.2 124.8 180 top
FB20  PZ3216U221-2R0TF  [FB1206]  88.8 49.2 270 bottom
FB21  PZ3216U221-2R0TF  [FB1206]  91.2 60.4 0 top
FB22  PZ3216U221-2R0TF  [FB1206]  91.2 62.7 0 top
J1  FWF12505-S05S24W5M  [CON5_1P25_FWF12505_F_SMD]  97.4 87.85 90 bottom
J2  Header 2  [SCREW_HEADER1X2_3P81_F_THT]  96.4 71.4 270 bottom
J3  TF Card  [MICROSD_PP_TF-01A_SMD_R]  85.15 105.47 90 top
J5  Header 3  [HEADER1X3_2P54_M_THT]  36.7 85.9 0 top
J6  C-103012662-00  [MICRO_USB_C-103012662-00_F_SMD_R]  14.9 4.4 0 top
J7  C-120010911-00  [RJ45_LED2_C-120010911-00_F_THT_R]  50 6.9 0 top
J8  Header 3  [HEADER1X3_2P54_M_THT]  36.7 93.9 0 top
J9  5019515010  [ZIF50_0P5_5019515010_SMD]  6.4 108 90 top
J10  5019515010  [ZIF50_0P5_5019515010_SMD]  6.4 28 90 top
J11  5019515010  [ZIF50_0P5_5019515010_SMD]  6.4 68 90 top
J12  50P Bottom Contact  [ZIF50_0P5_FPC50P-T1T1-2020-A_SMD_R]  25.75 132.15 0 top
J13  501951-4010  [ZIF40_0P5_5019514010_SMD]  64 131.5 0 top
J14  FWF12505-S02S24W5M  [CON2_1P25_FWF12505_F_SMD]  97.6 23.8 270 top
J15  FWF12505-S02S24W5M  [CON2_1P25_FWF12505_F_SMD]  97.6 14.2 270 top
J16  Header 2  [SCREW_HEADER1X2_3P81_F_THT]  96.4 33.4 270 bottom
J17  PJ-327A0-SMT  [PJ_327A0_SMT_R]  82.8 3 90 top
J18  PJ-327A0-SMT  [PJ_327A0_SMT_R]  67.8 3 90 top
J19  Header 2  [SCREW_HEADER1X2_3P81_F_THT]  96.4 52.4 270 bottom
J20  Header 2  [SCREW_HEADER1X2_3P81_F_THT]  96.4 42.9 270 bottom
J21  C-103012662-00  [MICRO_USB_C-103012662-00_F_SMD_R]  28.6 4.4 0 top
J23  Header 3  [HEADER1X3_2P54_M_THT]  26.9 20.8 0 top
J24  XH2.54-2P  [HX25405-2A_2P54_F_THT]  40.45 99.8 180 top
J25  501951-4010  [ZIF40_0P5_5019514010_SMD]  66.45 111.2 180 top
J26  DC-005-A200  [DJ_DC-005_THT_R]  92.5 120.88 0 top
J27  FWF12505-S03S24W5M  [CON3_1P25_FWF12505_F_SMD]  46.6 132.4 0 top
J28  Header8  [HEADER1X8_2P54_M_THT]  16.7 32.7 90 top
J29  Header 3  [HEADER1X3_2P54_M_THT]  36.7 89.9 0 top
J30  50P Bottom Contact  [ZIF50_0P5_FPC50P-T1T1-2020-A_SMD_R]  57.58 132.15 180 bottom
J31  NC/Header2X6  [HEADER2X6_2P54_M_THT]  71.2 96.7 90 top
J32  Header 2  [SCREW_HEADER1X2_3P81_F_THT]  96.4 61.9 270 bottom
L1  NC/SDCW2012-2-900TF  [CM4_SDCW2012-2-900TF_SMD]  14.65 12.1 270 top
L2  ACP3225-501-2P-T000  [CM4_ACP3225-501-2P-T000_SMD]  70.2 121 180 top
L3  1uH  [L0503_5P4X5P2]  56.85 119.6 180 top
L4  2.2uH  [L0806]  19.2 111 270 top
L5  2.2uH  [L0806]  25.25 111 270 top
L6  2.2uH  [L0806]  77.3 80.9 270 bottom
L8  0.47uH  [L1008]  70.4 80.9 270 bottom
L10  2.2uH  [L0806]  49.5 105.3 270 bottom
L11  2.2uH  [L0806]  31.9 105.4 270 bottom
L12  0.47uH  [L1008]  63.1 80.9 270 bottom
L13  2.2uH  [L1008]  44.27 121.58 0 top
L14  2.2uH  [L0806]  42.8 110 270 bottom
L16  0.47uH  [L1008]  71.85 80.35 180 top
L17  0.47uH  [L1008]  63.2 74.9 270 top
L18  1.0uH  [L0402_4P4X4P2]  81.3 62.45 270 top
M1  MTH_C4P0  [MTH_C4P0C6P8_8X0P8]  5 131 0 top
M2  MTH_C4P0  [MTH_C4P0C6P8_8X0P8]  95 131 0 top
M3  MTH_C4P0  [MTH_C4P0C6P8_8X0P8]  5 5 0 top
M4  MTH_C4P0  [MTH_C4P0C6P8_8X0P8]  95 5 0 top
MARK1  C1P0  [MARK_C1P0]  3.65 125.7 0 top
MARK2  C1P0  [MARK_C1P0]  89 133.2 0 top
NOREF  -  []  96.68 0 90 top
NOREF#2  -  []  -76.9 114.25 0 top
NOREF#3  -  []  -219.68 -150.12 0 top
NOREF#4  -  []  30.27 89.92 0 top
NOREF#5  -  [unnamed#2]  40 64 270 top
NOREF#6  -  [unnamed#3]  91.8 9.15 0 top
NOREF#7  -  []  0 132.85 0 top
NOREF#8  -  []  -2147.48 -2147.48 0 top
NOREF#9  -  []  -77.5 103.95 0 top
NOREF#10  -  [unnamed#3]  89 133.2 180 bottom
NOREF#11  -  [unnamed#3]  91.8 9.15 180 bottom
NOREF#12  -  [unnamed#3]  3.65 125.7 180 bottom
P1  NM_NOPASTE  [NMPAD_NOPASTE]  46.7 99.6 270 bottom
P2  NM_NOPASTE  [NMPAD_NOPASTE]  34.8 99.6 270 bottom
P3  NM_PASTE  [NMPAD_PASTE]  19.3 104.7 270 top
P4  NM_PASTE  [NMPAD_PASTE]  25.2 104.7 270 top
P6  NM_NOPASTE  [NMPAD_NOPASTE]  66.2 71.3 180 bottom
P7  NM_PASTE  [NMPAD_PASTE]  70.4 74.7 270 bottom
P10  NM_PASTE  [NMPAD_PASTE]  49.6 99.6 270 bottom
P12  NM_PASTE  [NMPAD_PASTE]  63.2 74.7 270 bottom
P13  NM_NOPASTE  [NMPAD_NOPASTE]  34.8 103.5 270 bottom
P15  NM_PASTE  [NMPAD_PASTE]  32.1 99.6 270 bottom
P16  NM_NOPASTE  [NMPAD_NOPASTE]  50.2 122.38 0 top
P17  NM_NOPASTE  [NMPAD_NOPASTE]  42.8 103.9 270 bottom
P18  NM_NOPASTE  [NMPAD_NOPASTE]  69.75 74.7 270 top
P19  NM_NOPASTE  [NMPAD_NOPASTE]  65.2 70.4 270 top
P20  NM_PASTE  [NMPAD_PASTE]  77.15 73.5 270 bottom
Q1  WPM2341-3/TR  [SOT23_3]  84.97 102.28 180 bottom
Q2  PMBT3904  [SOT23_3]  84.97 96.47 180 bottom
Q3  WNM2020  [SOT23_3]  60.7 62 0 top
Q5  WNM2020  [SOT23_3]  15.1 8.1 90 top
Q6  WPM2341-3/TR  [SOT23_3]  41.7 106.75 180 top
Q7  PMBT3904  [SOT23_3]  45.4 106.75 180 top
R1  0R/1%  [R0402S]  47.9 58.3 0 top
R2  0R/1%  [R0402S]  47.9 60.1 0 top
R4  0R/1%  [R0402S]  44 54.5 270 top
R5  1.4K/1%  [R0402S]  53.5 61.85 0 top
R7  47K/1%  [R0402S]  78.75 68.2 0 top
R8  47K/1%  [R0402S]  78.75 66.47 180 top
R9  100R/1%  [R0402S]  47.5 49.7 180 top
R10  47K/1%  [R0402S]  75.08 61.8 180 top
R11  47K/1%  [R0402S]  78.35 63.5 270 top
R14  200R/1%  [R0402S]  53.5 62.75 180 top
R16  620R/1%  [R0402S]  8.3 43.45 180 top
R17  NC/10M/1%  [R0402S]  43.2 49.7 180 top
R18  1M/1%  [R0402S]  45.8 49.7 180 top
R19  0R/1%  [R0402S]  41.5 49.7 0 top
R21  1.5K/1%  [R0402S]  32.5 125.8 90 top
R22  1.5K/1%  [R0402S]  31.6 125.8 90 top
R23  1.5K/1%  [R0402S]  22.2 122 0 top
R24  1.5K/1%  [R0402S]  22.2 122.9 0 top
R27  0R/1%  [R0402S]  12 49.6 0 top
R28  1K/1%  [R0402S]  88.4 82 0 top
R29  4.7K/1%  [R0402S]  88.4 75.3 0 top
R30  47K/1%  [R0402S]  88.4 82.9 0 top
R31  4.7K/1%  [R0402S]  12.3 52.9 0 top
R32  4.7K/1%  [R0402S]  12.3 53.8 0 top
R33  1K/1%  [R0402S]  88.4 77.4 180 top
R34  1K/1%  [R0402S]  88.4 78.3 180 top
R35  0R/1%  [R0402S]  45.7 127.2 90 bottom
R36  0R/1%  [R0402S]  39.5 73 90 top
R40  0R/1%  [R0402S]  82.67 102.17 90 bottom
R41  4.7K/1%  [R0402S]  84.97 98.88 0 bottom
R42  NC/47K/1%  [R0402S]  41.1 82.5 90 top
R43  10K/1%  [R0402S]  81.75 102.15 270 bottom
R46  NC/1K/1%  [R0402S]  42.1 82.5 90 top
R52  NC/0R/1%  [R0402S]  45.55 89.45 90 top
R53  NC/0R/1%  [R0402S]  44.65 89.45 90 top
R54  NC/0R/1%  [R0402S]  46.45 89.45 90 top
R55  NC/0R/1%  [R0402S]  47.35 89.45 90 top
R56  NC/0R/1%  [R0402S]  49.15 89.45 90 top
R57  NC/0R/1%  [R0402S]  48.25 89.45 90 top
R59  4.7K/1%  [R0402S]  43.1 80.8 270 top
R60  0R/1%  [R0402S]  51.45 85.75 270 top
R61  NC/0R/1%  [R0402S]  56.8 83 90 top
R62  0R/1%  [R0402S]  54.2 88 180 bottom
R63  0R/1%  [R0402S]  52.35 85.75 270 top
R64  0R/1%  [R0402S]  55.9 83 270 top
R66  0R/1%  [R0402S]  58.8 86.3 180 bottom
R67  0R/1%  [R0402S]  56.2 85.3 180 bottom
R68  0R/1%  [R0402S]  51.85 81.95 270 top
R69  4.7K/1%  [R0402S]  56.2 87.1 0 bottom
R70  4.7K/1%  [R0402S]  56.2 88 0 bottom
R71  4.7K/1%  [R0402S]  52.3 83.6 270 top
R72  NC/4.7K/1%  [R0402S]  56.2 86.2 180 bottom
R73  0R/1%  [R0402S]  44.4 71.45 0 top
R74  NC/0R/1%  [R0402S]  55.5 94.4 90 top
R75  NC/0R/1%  [R0402S]  53.7 94.4 90 top
R76  NC/0R/1%  [R0402S]  56.4 94.4 90 top
R77  NC/0R/1%  [R0402S]  58.2 94.4 90 top
R78  NC/0R/1%  [R0402S]  57.3 94.4 90 top
R79  NC/0R/1%  [R0402S]  54.6 94.4 90 top
R83  NC/0R/1%  [R0402S]  55.5 92.7 270 top
R85  NC/0R/1%  [R0402S]  56.4 92.7 270 top
R87  NC/0R/1%  [R0402S]  58.2 92.7 270 top
R88  NC/0R/1%  [R0402S]  52.8 94.4 90 top
R89  NC/0R/1%  [R0402S]  57.3 92.7 270 top
R90  NC/0R/1%  [R0402S]  54.6 92.7 270 top
R91  NC/0R/1%  [R0402S]  53.7 92.7 270 top
R93  10K/1%  [R0402S]  59.1 97.3 180 top
R94  10K/1%  [R0402S]  56.8 96.6 0 top
R95  0R/1%  [R0402S]  54.6 98.4 0 top
R96  NC/0R/1%  [R0402S]  60.8 99.7 180 top
R97  0R/1%  [R0402S]  14.2 12.1 270 top
R98  0R/1%  [R0402S]  15.1 12.1 270 top
R99  100K/1%  [R0402S]  12.1 11.9 0 bottom
R100  1K/1%  [R0402S]  12.1 11 180 bottom
R101  4.7K/1%  [R0402S]  19.6 8 270 top
R102  470R/1%  [R0402S]  9.8 10.1 0 bottom
R104  2.2R/1%  [R0402S]  42.9 30.45 0 top
R105  0R/1%  [R0402S]  40 14.9 180 bottom
R106  0R/1%  [R0402S]  60 14.9 0 bottom
R107  2.2R/1%  [R0402S]  42.9 31.35 0 top
R108  2.2R/1%  [R0402S]  50.55 31 0 top
R109  470R/1%  [R0402S]  60 11.5 180 bottom
R110  2.2R/1%  [R0402S]  50.55 31.9 0 top
R112  470R/1%  [R0402S]  40 11.5 0 bottom
R113  0R/1%  [R1206]  38.4 7.9 0 top
R114  0R/1%  [R0402S]  32.7 66.5 270 bottom
R115  0R/1%  [R0402S]  34.7 61.9 0 bottom
R116  0R/1%  [R0402S]  27.3 86.5 0 top
R117  0R/1%  [R0402S]  27.3 81.5 0 top
R119  NC/0R/1%  [R0402S]  27.3 86.5 0 bottom
R120  NC/0R/1%  [R0402S]  27.3 81.5 0 bottom
R121  0R/1%  [R0402S]  27.3 85.5 0 top
R122  0R/1%  [R0402S]  27.3 80.5 0 top
R124  NC/0R/1%  [R0402S]  27.3 85.5 0 bottom
R125  NC/0R/1%  [R0402S]  27.3 80.5 0 bottom
R126  NC/0R/1%  [R0402S]  27.3 84.5 0 top
R127  0R/1%  [R0402S]  27.3 79.5 0 top
R129  NC/0R/1%  [R0402S]  27.3 84.5 0 bottom
R130  NC/0R/1%  [R0402S]  27.3 79.5 0 bottom
R131  0R/1%  [R0402S]  27.3 83.5 0 top
R132  0R/1%  [R0402S]  27.3 78.5 0 top
R134  NC/0R/1%  [R0402S]  27.3 83.5 0 bottom
R135  NC/0R/1%  [R0402S]  27.3 78.5 0 bottom
R137  0R/1%  [R0402S]  27.3 82.5 0 top
R138  0R/1%  [R0402S]  27.3 77.5 0 top
R139  NC/0R/1%  [R0402S]  27.3 82.5 0 bottom
R140  NC/0R/1%  [R0402S]  27.3 77.5 0 bottom
R141  0R/1%  [R0402S]  27.3 76.5 0 top
R142  NC/0R/1%  [R0402S]  27.3 76.5 0 bottom
R143  0R/1%  [R0402S]  23 72.1 0 top
R144  0R/1%  [R0402S]  23 64.9 0 top
R145  NC/0R/1%  [R0402S]  23.9 72.1 180 top
R146  NC/0R/1%  [R0402S]  23.9 64.9 180 top
R147  0R/1%  [R0402S]  23 70.9 0 top
R148  0R/1%  [R0402S]  23 63.7 0 top
R149  NC/0R/1%  [R0402S]  23.9 70.9 180 top
R150  NC/0R/1%  [R0402S]  23.9 63.7 180 top
R151  0R/1%  [R0402S]  23 69.7 0 top
R152  0R/1%  [R0402S]  23 62.5 0 top
R153  NC/0R/1%  [R0402S]  23.9 69.7 180 top
R154  NC/0R/1%  [R0402S]  23.9 62.5 180 top
R155  0R/1%  [R0402S]  23 68.5 0 top
R156  0R/1%  [R0402S]  23 61.3 0 top
R157  NC/0R/1%  [R0402S]  23.9 68.5 180 top
R158  NC/0R/1%  [R0402S]  23.9 61.3 180 top
R159  0R/1%  [R0402S]  23 67.3 0 top
R160  0R/1%  [R0402S]  23 60.1 0 top
R161  NC/0R/1%  [R0402S]  23.9 67.3 180 top
R162  NC/0R/1%  [R0402S]  23.9 60.1 180 top
R163  0R/1%  [R0402S]  23 66.1 0 top
R164  0R/1%  [R0402S]  23 58.9 0 top
R165  NC/0R/1%  [R0402S]  23.9 66.1 180 top
R166  NC/0R/1%  [R0402S]  23.9 58.9 180 top
R167  0R/1%  [R0402S]  10.1 58.8 180 top
R168  0R/1%  [R0402S]  10.3 15.9 180 top
R169  0R/1%  [R0402S]  4.8 96.5 90 bottom
R170  0R/1%  [R0402S]  10.3 17.7 0 top
R171  0R/1%  [R0402S]  10.3 18.6 180 top
R172  0R/1%  [R0402S]  8.8 98.5 90 bottom
R173  NC/1K/1%  [R0402S]  10.1 59.7 0 top
R174  NC/1K/1%  [R0402S]  10.3 19.5 0 top
R175  NC/1K/1%  [R0402S]  10.4 99.8 0 top
R176  0R/1%  [R0402S]  5.7 100.6 90 bottom
R177  0R/1%  [R0402S]  7.1 60.4 0 bottom
R178  NC/0R/1%  [R0402S]  10.3 23.1 0 top
R179  0R/1%  [R0402S]  5.2 59.4 180 bottom
R180  0R/1%  [R0402S]  4.8 58.2 0 bottom
R181  0R/1%  [R0402S]  10.1 57.9 180 top
R182  0R/1%  [R0402S]  6.6 98.5 270 bottom
R183  0R/1%  [R0402S]  10.3 20.4 180 top
R184  0R/1%  [R0402S]  9.7 98.5 90 bottom
R185  0R/1%  [R0402S]  5.4 60.4 0 bottom
R186  NC/0R/1%  [R0402S]  10.3 21.3 180 top
R188  0R/1%  [R0402S]  6.6 100.6 270 bottom
R189  NC/0R/1%  [R0402S]  10.4 101.8 180 top
R190  NC/0R/1%  [R0402S]  10.4 102.7 0 top
R191  NC/0R/1%  [R0402S]  33.5 74.3 180 bottom
R192  0R/1%  [R0402S]  33.5 75.2 180 bottom
R193  NC/0R/1%  [R0402S]  38.1 75.2 90 top
R194  0R/1%  [R0402S]  40.1 75.6 90 top
R195  NC/0R/1%  [R0402S]  41.1 75.6 90 top
R196  NC/0R/1%  [R0402S]  39.1 79 270 top
R197  0R/1%  [R0402S]  10.1 77.4 0 top
R198  0R/1%  [R0402S]  10.1 78.3 180 top
R199  0R/1%  [R0402S]  10.3 37.55 0 top
R200  0R/1%  [R0402S]  10.3 38.45 180 top
R201  0R/1%  [R0402S]  10.4 117.7 0 top
R202  0R/1%  [R0402S]  10.4 118.6 180 top
R203  4.7K/1%  [R0402S]  6 84.2 0 top
R204  4.7K/1%  [R0402S]  6.1 90 0 top
R205  4.7K/1%  [R0402S]  6 85.5 180 top
R206  4.7K/1%  [R0402S]  6.1 90.9 180 top
R207  4.7K/1%  [R0402S]  16.6 63.8 90 top
R208  4.7K/1%  [R0402S]  17.1 66.8 0 bottom
R209  0R/1%  [R0402S]  24.3 85.5 0 top
R210  0R/1%  [R0402S]  24.3 84.5 0 top
R211  NC/0R/1%  [R0402S]  22.65 85.5 180 top
R212  0R/1%  [R0402S]  24.3 83.5 0 top
R213  NC/0R/1%  [R0402S]  22.65 84.5 180 top
R214  0R/1%  [R0402S]  24.3 82.5 0 top
R215  0R/1%  [R0402S]  24.3 81.5 0 top
R216  NC/0R/1%  [R0402S]  22.65 83.5 180 top
R217  0R/1%  [R0402S]  24.3 80.5 0 top
R218  NC/0R/1%  [R0402S]  22.65 82.5 180 top
R219  0R/1%  [R0402S]  24.3 79.5 0 top
R220  NC/0R/1%  [R0402S]  22.65 81.5 180 top
R221  0R/1%  [R0402S]  24.3 78.5 0 top
R222  NC/0R/1%  [R0402S]  22.65 80.5 180 top
R223  0R/1%  [R0402S]  5.7 96.5 90 bottom
R224  0R/1%  [R0402S]  5.7 98.5 90 bottom
R225  0R/1%  [R0402S]  7.9 98.5 90 bottom
R226  NC/0R/1%  [R0402S]  18.5 81.5 180 top
R227  0R/1%  [R0402S]  32.5 127.8 90 top
R228  0R/1%  [R0402S]  20.2 78.5 0 top
R229  0R/1%  [R0402S]  31.6 127.8 270 top
R230  0R/1%  [R0402S]  24.3 77.5 0 top
R231  NC/0R/1%  [R0402S]  22.65 79.5 180 top
R232  0R/1%  [R0402S]  24.3 86.5 0 top
R233  NC/0R/1%  [R0402S]  22.65 78.5 180 top
R234  0R/1%  [R0402S]  20.2 79.5 0 top
R235  NC/0R/1%  [R0402S]  33.4 127.8 90 top
R236  NC/0R/1%  [R0402S]  22.65 77.5 180 top
R237  0R/1%  [R0402S]  20.2 77.5 0 top
R238  NC/0R/1%  [R0402S]  22.65 86.5 180 top
R239  0R/1%  [R0402S]  20.2 86.5 0 top
R240  0R/1%  [R0402S]  20.2 76.5 0 top
R241  0R/1%  [R0402S]  20.2 85.5 0 top
R242  0R/1%  [R0402S]  22.65 76.5 180 top
R243  NC/0R/1%  [R0402S]  24.3 76.5 0 top
R244  NC/0R/1%  [R0402S]  18.5 83.5 180 top
R245  0R/1%  [R0402S]  12.5 117.7 180 top
R246  0R/1%  [R0402S]  12.5 118.6 180 top
R247  0R/1%  [R0402S]  60.2 127.5 270 top
R248  33R/1%  [R0402S]  61.1 127.5 90 top
R250  4.7K/1%  [R0402S]  54.9 127.5 270 top
R251  0R/1%  [R0402S]  56 47.8 90 top
R252  0R/1%  [R0402S]  45.5 58 180 bottom
R254  0R/1%  [R0402S]  52.2 41.2 0 top
R255  0R/1%  [R0402S]  71.3 47.8 90 top
R256  0R/1%  [R0402S]  67.5 41.2 0 top
R257  1.1K/1%  [R0402S]  90 16.5 0 top
R258  1.1K/1%  [R0402S]  90 26.2 0 top
R259  1.1K/1%  [R0402S]  90 15.6 180 top
R260  1.1K/1%  [R0402S]  90 25.3 180 top
R261  NC/10K/1%  [R0402S]  91.3 14.3 270 top
R262  NC/10K/1%  [R0402S]  91.3 23.8 270 top
R263  1.1K/1%  [R0402S]  90.4 12.5 270 top
R264  1.1K/1%  [R0402S]  90.4 22.1 270 top
R265  1.1K/1%  [R0402S]  91.3 12.5 90 top
R266  1.1K/1%  [R0402S]  91.3 22.1 90 top
R267  0R/1%  [R0402S]  59 54.25 270 top
R268  10K/1%  [R0402S]  57.35 56.65 180 top
R269  10K/1%  [R0402S]  78.4 34.2 0 top
R271  0R/1%  [R0402S]  78.4 33.3 0 top
R272  NC/1R/1%  [R0805S]  87.5 32.8 90 top
R273  0R/1%  [R0402S]  78.4 32.4 0 top
R274  0R/1%  [R0402S]  66.5 56.8 90 top
R275  0R/1%  [R0603S]  87.7 71.1 270 bottom
R276  NC/0R/1%  [R0603S]  89.2 71.1 270 bottom
R278  0R/1%  [R0402S]  67.4 52.5 0 top
R279  0R/1%  [R0402S]  61.6 53.4 180 top
R280  0R/1%  [R0402S]  67.4 54.3 0 top
R281  0R/1%  [R0402S]  67.4 53.4 0 top
R282  0R/1%  [R0603S]  83.8 71.1 270 bottom
R283  0R/1%  [R0402S]  67.4 55.2 0 top
R284  NC/0R/1%  [R0603S]  85.3 71.1 270 bottom
R285  0R/1%  [R0402S]  61.6 55.2 180 top
R286  0R/1%  [R0402S]  61.6 54.3 180 top
R287  0R/1%  [R0402S]  63.8 56.8 90 top
R288  100K/1%  [R0402S]  64.7 56.8 90 top
R289  47K/1%  [R0402S]  63.8 58.5 270 top
R290  100K/1%  [R0402S]  90.78 79.9 270 bottom
R291  0R/1%  [R0402S]  71.8 56.8 90 top
R292  NC/0R/1%  [R0402S]  77.1 50.1 180 top
R293  0R/1%  [R0402S]  77.1 51 180 top
R295  100K/1%  [R0402S]  86.1 79.9 270 bottom
R296  0R/1%  [R0402S]  77.1 54.6 0 top
R297  0R/1%  [R0402S]  75.4 56.8 90 top
R298  0R/1%  [R0402S]  76.3 56.8 90 top
R299  0R/1%  [R0402S]  74.5 56.8 90 top
R300  0R/1%  [R0402S]  71.1 54.6 180 top
R301  0R/1%  [R0402S]  71.1 52.8 180 top
R303  0R/1%  [R0402S]  71.1 53.7 180 top
R304  0R/1%  [R0402S]  84.95 53.6 90 bottom
R305  0R/1%  [R0402S]  77.7 14.3 90 top
R306  0R/1%  [R0402S]  80.7 14.3 90 top
R307  10K/1%  [R0402S]  79.8 14.3 270 top
R308  10K/1%  [R0402S]  76.8 14.3 270 top
R309  0R/1%  [R0402S]  84.05 53.6 90 bottom
R310  0R/1%  [R0402S]  67.3 13.7 270 top
R311  0R/1%  [R0402S]  69.1 13.7 270 top
R312  10K/1%  [R0402S]  70 13.7 90 top
R313  10K/1%  [R0402S]  66.4 13.7 90 top
R314  10K/1%  [R0402S]  89.9 48.5 180 top
R315  20K/1%  [R0402S]  85.2 51.9 90 top
R316  20K/1%  [R0402S]  83.9 51.5 0 top
R317  20K/1%  [R0402S]  81.6 47.2 0 top
R318  20K/1%  [R0402S]  82.9 46.8 270 top
R319  2K/1%  [R0402S]  68.6 32.8 270 bottom
R320  30K/1%  [R0402S]  66.8 32.8 90 bottom
R321  4.7K/1%  [R0402S]  65.9 32.8 90 bottom
R322  4.7K/1%  [R0402S]  65.9 34.5 90 bottom
R323  2K/1%  [R0402S]  68.6 34.5 90 bottom
R324  30K/1%  [R0402S]  66.8 34.5 270 bottom
R325  2K/1%  [R0402S]  68.6 37.9 270 bottom
R326  30K/1%  [R0402S]  66.8 37.9 90 bottom
R327  4.7K/1%  [R0402S]  65.9 37.9 90 bottom
R328  4.7K/1%  [R0402S]  65.9 39.6 90 bottom
R329  2K/1%  [R0402S]  68.6 39.6 90 bottom
R330  30K/1%  [R0402S]  66.8 39.6 270 bottom
R332  NC/4.7K/1%  [R0402S]  19.2 29.6 180 bottom
R333  NC/4.7K/1%  [R0402S]  19.2 37 180 top
R334  NC/4.7K/1%  [R0402S]  19.2 38.05 180 top
R335  0R/1%  [R0402S]  19.2 26 180 bottom
R336  NC/1K/1%  [R0402S]  19.2 26.9 0 top
R337  4.7K/1%  [R0402S]  27.1 14.7 270 bottom
R338  4.7K/1%  [R0402S]  29.8 14.7 270 bottom
R339  4.7K/1%  [R0402S]  25.2 17.8 0 bottom
R340  NC/4.7K/1%  [R0402S]  25.2 16.9 0 bottom
R341  0R/1%  [R0402S]  28 14.7 90 bottom
R342  0R/1%  [R0402S]  28.9 14.7 90 bottom
R343  10K/1%  [R0402S]  24.7 8 0 bottom
R344  4.7K/1%  [R0402S]  41.8 110.15 0 top
R345  10K/1%  [R0402S]  41.05 104.35 180 top
R346  47K/1%  [R0402S]  47.75 107.45 90 top
R347  100K/1%  [R0402S]  60.45 122.7 270 top
R348  0.005R/1%  [R2512_4P]  45.08 117.3 180 top
R349  4.7K/1%  [R0402S]  74.3 127.5 90 top
R350  1K/1%  [R0402S]  56.67 123.45 90 top
R351  40.2K/1%  [R0402S]  57.95 123.92 180 top
R352  10K/1%  [R0402S]  62.25 122.7 90 top
R353  4.7K/1%  [R0402S]  63.15 122.7 90 top
R354  5.49K/1%  [R0402S]  59.23 123.45 270 top
R355  0R/1%  [R0603S]  17 99.5 270 top
R357  NC/0R/1%  [R0603S]  17 94.9 90 top
R359  0.005R/1%  [R2512_4P]  19.9 97.2 270 top
R360  0.005R/1%  [R2512_4P]  25.7 97.2 270 top
R361  200K/1%  [R0402S]  17.6 110.25 90 top
R362  100K/1%  [R0402S]  23.55 110.2 90 top
R363  100K/1%  [R0402S]  16.7 111.9 90 top
R364  100K/1%  [R0402S]  22.65 111.85 90 top
R365  100K/1%  [R0402S]  15.8 110.25 270 top
R366  22.1K/1%  [R0402S]  21.75 110.2 270 top
R372  0.005R/1%  [R2512_4P]  76.6 68.2 270 bottom
R374  80.6K/1%  [R0402S]  79.9 80.28 90 bottom
R375  150K/1%  [R0402S]  80.8 82.35 270 bottom
R378  80.6K/1%  [R0402S]  80.8 80.28 270 bottom
R380  0.005R/1%  [R2512_4P]  68.4 66.3 0 bottom
R381  40.2K/1%  [R0402S]  69.65 85.85 270 top
R382  30K/1%  [R0402S]  55.8 82.28 0 bottom
R383  100K/1%  [R0402S]  73.3 81.8 90 bottom
R384  240K/1%  [R0402S]  66.97 85.85 90 top
R385  10K/1%  [R0402S]  57.45 82.28 180 bottom
R387  80.6K/1%  [R0402S]  70.55 85.85 270 top
R388  20K/1%  [R0402S]  65.15 85.85 270 top
R393  0R/1%  [R0603S]  51 94.7 270 bottom
R394  NC/0R/1%  [R0603S]  51 91.8 90 bottom
R395  0.005R/1%  [R2512_4P]  47.8 94 270 bottom
R396  0.005R/1%  [R2512_4P]  31.5 94 270 bottom
R397  200K/1%  [R0402S]  47.7 108.4 0 bottom
R398  NC/100K/1%  [R0402S]  53.2 110.6 180 bottom
R399  100K/1%  [R0402S]  34.62 112.53 270 bottom
R400  100K/1%  [R0402S]  53.2 109.7 180 bottom
R401  NC/100K/1%  [R0402S]  35.23 107.9 270 bottom
R402  100K/1%  [R0402S]  35.23 106.25 90 bottom
R403  100K/1%  [R0402S]  47.7 109.3 180 bottom
R404  22.1K/1%  [R0402S]  33.75 112.53 90 bottom
R407  30K/1%  [R0402S]  55.8 79.6 0 bottom
R408  0.005R/1%  [R2512_4P]  59 67.9 0 bottom
R409  240K/1%  [R0402S]  67.4 82.85 180 bottom
R410  10K/1%  [R0402S]  57.45 78.7 180 bottom
R412  20K/1%  [R0402S]  67.4 81.05 0 bottom
R413  NC/100K/1%  [R0402S]  64.25 84 90 top
R414  40.2K/1%  [R0402S]  67.4 85.55 0 bottom
R415  100K/1%  [R0402S]  66.95 84 90 top
R416  80.6K/1%  [R0402S]  67.4 86.45 0 bottom
R421  10K/1%  [R0402S]  45.62 125.65 180 top
R422  NC/4.7K/1%  [R0402S]  44.25 128 270 top
R423  150K/1%  [R0402S]  55 83 270 top
R424  4.7K/1%  [R0402S]  39.77 128 270 top
R425  75K/1%  [R0402S]  54.1 83 90 top
R426  4.7K/1%  [R0402S]  45.62 124.75 0 top
R427  NC/4.7K/1%  [R0402S]  40.67 128 90 top
R428  2K/1%  [R0402S]  41.55 128 90 top
R429  511R/1%  [R0402S]  42.45 128 90 top
R430  4.7K/1%  [R0402S]  43.35 128 90 top
R431  NC/33K/1%  [R0402S]  55.8 80.47 0 bottom
R432  0R/1%  [R0402S]  69.2 127.5 90 bottom
R433  NC/0R/1%  [R0402S]  42.1 77.3 270 top
R434  NC/0R/1%  [R0402S]  48.7 127.2 270 bottom
R435  NC/0R/1%  [R0402S]  49.6 127.2 270 bottom
R442  NC/0R/1%  [R0402S]  40.1 80.8 270 top
R443  NC/0R/1%  [R0402S]  39.1 80.8 270 top
R444  NC/0R/1%  [R0402S]  37.1 77.3 270 top
R446  NC/0R/1%  [R0402S]  60.4 127.2 270 bottom
R447  NC/0R/1%  [R0402S]  61.3 127.2 270 bottom
R450  NC/0R/1%  [R0402S]  53.55 127.2 270 bottom
R453  10K/1%  [R0402S]  78.6 105.7 0 top
R454  10K/1%  [R0402S]  78.6 106.7 0 top
R455  10K/1%  [R0402S]  78.6 104.8 0 top
R456  10K/1%  [R0402S]  78.6 100.15 0 top
R457  10K/1%  [R0402S]  78.6 99.15 0 top
R458  10K/1%  [R0402S]  75.45 90.8 180 top
R459  10K/1%  [R0402S]  75.45 91.7 180 top
R460  10K/1%  [R0402S]  75.45 92.6 180 top
R461  10K/1%  [R0402S]  75.45 93.5 180 top
R462  10K/1%  [R0402S]  75.45 94.4 180 top
R463  NC/0R/1%  [R0402S]  77.15 93.5 0 top
R464  0R/1%  [R0402S]  81.55 64.15 180 bottom
R465  0R/1%  [R0402S]  81.55 63.25 180 bottom
R466  0R/1%  [R0402S]  86.35 61.4 270 bottom
R467  0R/1%  [R0402S]  81.55 60.55 180 bottom
R468  0R/1%  [R0402S]  81.55 59.65 180 bottom
R469  0R/1%  [R0402S]  81.55 61.45 180 bottom
R470  0R/1%  [R0402S]  81.55 62.35 180 bottom
R471  0R/1%  [R0402S]  87.25 65 90 top
R472  NC/0R/1%  [R0805S]  46.5 128.2 180 top
R473  0R/1%  [R0805S]  49.05 127.3 270 top
R474  NC/0R/1%  [R0402S]  97.4 56.7 0 top
R475  0R/1%  [R0402S]  95.4 56.7 180 top
R476  0R/1%  [R0402S]  95.4 57.6 180 top
R477  NC/0R/1%  [R0402S]  97.4 57.6 0 top
R478  NC/0R/1%  [R0402S]  29.5 77.5 0 top
R480  NC/0R/1%  [R0402S]  51.6 63.65 0 top
R481  NC/0R/1%  [R0402S]  53.3 52.5 0 top
R482  NC/0R/1%  [R0402S]  51.6 56.1 0 top
R483  0R/1%  [R0402S]  10.3 36.6 180 top
R484  0R/1%  [R0402S]  10.1 75.25 180 top
R485  0R/1%  [R0402S]  10.3 34.8 180 top
R486  0R/1%  [R0402S]  10.4 115.25 180 top
R487  0R/1%  [R0402S]  88.15 65 90 top
R488  NC/0R/1%  [R0402S]  87.65 97.4 180 bottom
R489  0R/1%  [R0402S]  82.25 105.3 0 bottom
R490  75R/1%  [R1206]  40.1 13.2 90 top
R606  NC/0R/1%  [R0402S]  46.9 54 0 top
R607  10K/1%  [R0402S]  58 62.7 0 top
R661  100K/1%  [R0402S]  58 61.6 0 top
R662  NC/4.7K/1%  [R0402S]  58 60.3 180 top
R663  10K/1%  [R0402S]  31.5 16.4 180 bottom
R668  75R/1%  [R1206]  48.3 17.85 180 top
R669  0R/1%  [R0402S]  12.3 52 0 top
R671  0R/1%  [R0402S]  62 56.8 90 top
R672  1.5K/1%  [R0402S]  18.9 52.1 180 top
R673  1.5K/1%  [R0402S]  18.9 53.1 180 top
R676  NC/100K/1%  [R0402S]  53.2 108.8 180 bottom
R677  100K/1%  [R0402S]  41.15 112.45 270 bottom
R678  NC/100K/1%  [R0402S]  65.15 84 90 top
R679  NC/100K/1%  [R0402S]  34.35 106.25 90 bottom
R680  0R/1%  [R0603S]  34.6 95.1 270 bottom
R681  NC/0R/1%  [R0603S]  34.6 92.2 90 bottom
R690  47K/1%  [R0402S]  87.65 96.5 180 bottom
R693  0R/1%  [R0402S]  87.7 69.3 270 top
R694  NC/0R/1%  [R0402S]  89.5 69.3 270 top
R695  0R/1%  [R0402S]  72.7 56.8 90 top
R696  NC/0R/1%  [R0402S]  77.1 55.5 0 top
R697  NC/4.7K/1%  [R0402S]  19.2 39.1 180 top
R698  10K/1%  [R0402S]  19.2 29.6 180 top
R700  0R/1%  [R0402S]  46.9 53.1 0 top
R701  NC/0R/1%  [R0402S]  46.9 54.9 0 top
R702  0R/1%  [R0402S]  48.9 55.8 0 top
R703  NC/0R/1%  [R0402S]  48.9 54.9 0 top
R704  0R/1%  [R0402S]  20.9 32.3 180 top
R705  NC/0R/1%  [R0402S]  20.9 31.4 180 top
R706  0R/1%  [R0402S]  19.2 26 180 top
R707  NC/0R/1%  [R0402S]  20.9 27.8 180 top
R708  NC/0R/1%  [R0402S]  53.5 60.9 0 top
R709  0R/1%  [R0402S]  51.6 52.5 180 top
R710  NC/0R/1%  [R0402S]  51.6 53.4 0 top
R711  0R/1%  [R0402S]  51.6 57 0 top
R712  0R/1%  [R0402S]  51.6 62.75 0 top
R713  NC/0R/1%  [R0402S]  47.9 61.98 0 top
R714  NC/0R/1%  [R0402S]  46.9 55.8 0 top
R715  NC/0R/1%  [R0402S]  51.6 51.6 180 top
R716  NC/0R/1%  [R0402S]  48.9 54 0 top
R717  0R/1%  [R0402S]  43.1 79 270 top
R718  NC/0R/1%  [R0402S]  42.1 75.6 270 top
R719  NC/0R/1%  [R0402S]  35.1 75.2 270 top
R720  NC/0R/1%  [R0402S]  36.1 79 270 top
R721  NC/0R/1%  [R0402S]  42.1 79 270 top
R722  NC/0R/1%  [R0402S]  29.5 79.5 180 bottom
R723  NC/0R/1%  [R0402S]  36.1 77.3 90 top
R724  0R/1%  [R0402S]  36.1 75.2 270 top
R725  NC/0R/1%  [R0402S]  37.1 75.2 270 top
R726  NC/0R/1%  [R0402S]  29.5 80.5 180 bottom
R727  NC/0R/1%  [R0402S]  35.1 77.3 90 top
R728  NC/0R/1%  [R0402S]  35.1 79 270 top
R729  0R/1%  [R0402S]  42.1 80.8 270 top
R730  NC/0R/1%  [R0402S]  40.1 79 270 top
R731  NC/0R/1%  [R0402S]  37.1 80.8 270 top
R732  NC/0R/1%  [R0402S]  41.1 79 270 top
R733  0R/1%  [R0402S]  38.1 80.8 270 top
R734  NC/0R/1%  [R0402S]  38.1 79 90 top
R735  NC/0R/1%  [R0402S]  48.9 53.1 0 top
R736  NC/0R/1%  [R0402S]  10.3 16.8 0 top
R737  NC/0R/1%  [R0402S]  10.4 98.9 0 top
R738  0R/1%  [R0402S]  48.9 79 90 top
R739  NC/0R/1%  [R0402S]  29.5 86.5 180 bottom
R740  NC/0R/1%  [R0402S]  29.5 85.5 180 bottom
R741  NC/0R/1%  [R0402S]  29.5 83.5 180 bottom
R742  NC/0R/1%  [R0402S]  29.5 82.5 180 bottom
R743  NC/0R/1%  [R0402S]  29.5 78.5 180 bottom
R744  NC/0R/1%  [R0402S]  29.5 77.5 180 bottom
R745  NC/0R/1%  [R0402S]  29.5 76.5 180 top
R746  NC/0R/1%  [R0402S]  29.5 76.5 180 bottom
R747  NC/0R/1%  [R0402S]  29.5 81.5 180 bottom
R748  0R/1%  [R0402S]  29.5 84.5 180 bottom
R749  NC/0R/1%  [R0402S]  37.1 79 270 top
R752  NC/0R/1%  [R0402S]  51.6 60.9 0 top
R753  NC/0R/1%  [R0402S]  47.9 61.1 0 top
R755  NC/0R/1%  [R0402S]  51.6 61.85 0 top
R756  0R/1%  [R0402S]  51.6 64.55 0 top
R757  NC/0R/1%  [R0402S]  51.6 65.5 0 top
R758  4.7K/1%  [R0402S]  49.4 82.9 0 top
R759  1K/1%  [R0402S]  49.9 81.6 270 top
R760  NC/0R/1%  [R0402S]  47.9 59.2 0 top
R761  NC/0R/1%  [R0402S]  10.3 15 180 top
R762  NC/0R/1%  [R0402S]  3.9 96.5 90 bottom
R763  NC/0R/1%  [R0402S]  51.6 55.2 0 top
R764  NC/0R/1%  [R0402S]  51.6 54.3 0 top
R765  NC/0R/1%  [R0402S]  49.8 79 90 top
R766  0R/1%  [R0402S]  20.2 84.5 0 top
R767  0R/1%  [R0402S]  20.2 83.5 0 top
R768  0R/1%  [R0402S]  20.2 82.5 0 top
R769  0R/1%  [R0402S]  20.2 81.5 0 top
R770  0R/1%  [R0402S]  20.2 80.5 0 top
R771  NC/0R/1%  [R0402S]  34.1 77.3 90 top
R772  0R/1%  [R0805S]  36.65 117.4 180 top
R773  NC/0R/1%  [R0805S]  34.5 124.45 180 bottom
R775  0R/1%  [R0402S]  46.5 59.5 90 bottom
R776  22R/1%  [R0402S]  23.9 122 0 top
R777  22R/1%  [R0402S]  23.9 122.9 0 top
R778  470R/1%  [R0402S]  29.55 121.7 0 top
R779  100R/1%  [R0402S]  29.55 124.4 0 top
R780  0R/1%  [R0402S]  70.8 107.7 0 bottom
R781  0R/1%  [R0805S]  33.1 117.4 180 top
R782  0R/1%  [R0402S]  88.6 70.95 270 top
R783  NC/0R/1%  [R0402S]  89.5 70.95 270 top
R784  0R/1%  [R0402S]  87.7 70.95 270 top
R785  NC/0R/1%  [R0402S]  86.8 70.95 270 top
R786  100K/1%  [R0402S]  46.3 112 180 bottom
R787  100K/1%  [R0402S]  46.3 110.2 180 bottom
R788  300K/1%  [R0402S]  45.8 108.4 180 bottom
R789  100K/1%  [R0402S]  45.8 109.3 0 bottom
R790  100K/1%  [R0402S]  71.45 84 270 top
R791  82K/1%  [R0402S]  68.75 84 270 top
R792  200K/1%  [R0402S]  72.35 84 270 top
R793  82K/1%  [R0402S]  70.55 84 90 top
R794  0R/1%  [R0402S]  67.85 85.85 270 top
R795  NC/0R/1%  [R0402S]  67.85 84 90 top
R796  NC/100K/1%  [R0402S]  66.8 76.9 0 top
R797  100K/1%  [R0402S]  66.8 76 180 top
R798  NC/100K/1%  [R0402S]  66.8 77.8 180 top
R799  100K/1%  [R0402S]  66.8 81.4 180 top
R800  NC/150K/1%  [R0402S]  66.8 80.5 0 top
R801  NC/150K/1%  [R0402S]  66.8 79.6 180 top
R802  NC/0R/1%  [R0402S]  64.9 74.75 270 top
R803  NC/0R/1%  [R0402S]  66.7 78.7 0 bottom
R804  40.2K/1%  [R0402S]  66.7 76.9 0 bottom
R805  80.6K/1%  [R0402S]  66.7 76 0 bottom
R806  1K/1%  [R0402S]  66.7 77.8 180 bottom
R807  0R/1%  [R0402S]  67.4 83.75 0 bottom
R808  0R/1%  [R0402S]  55.8 81.4 180 bottom
R809  NC/0R/1%  [R0402S]  57.45 81.4 0 bottom
R810  0R/1%  [R0402S]  55.8 78.7 180 bottom
R811  NC/0R/1%  [R0402S]  57.45 79.6 0 bottom
R812  0R/1%  [R0402S]  75.8 108 180 top
R814  NC/0R/1%  [R0402S]  45.5 57.1 180 bottom
R815  NC/0R/1%  [R0402S]  29.5 78.5 0 top
R817  NC/0R/1%  [R0402S]  29.5 80.5 0 top
R818  NC/0R/1%  [R0402S]  29.5 79.5 0 top
R819  NC/0R/1%  [R0402S]  35.1 80.8 270 top
R820  NC/0R/1%  [R0402S]  34.1 79 90 top
R821  NC/0R/1%  [R0402S]  29.5 86.5 180 top
R822  0R/1%  [R0402S]  10.3 24 0 top
R823  0R/1%  [R0402S]  10.3 22.2 180 top
R824  NC/0R/1%  [R0402S]  75.45 95.3 180 top
R825  0R/1%  [R0402S]  35.1 73.55 90 top
R826  0R/1%  [R0402S]  34.15 73.95 90 top
R827  NC/0R/1%  [R0402S]  19.45 40.35 270 bottom
R828  0R/1%  [R0402S]  20.35 40.35 270 bottom
R829  NC/0R/1%  [R0402S]  19.2 27.8 180 top
R830  NC/0R/1%  [R0402S]  19.2 31.4 180 top
R831  0R/1%  [R0402S]  19.2 28.7 180 top
R832  0R/1%  [R0402S]  19.2 30.5 180 top
R833  4.7K/1%  [R0402S]  19.2 26.9 180 bottom
R834  0R/1%  [R0402S]  19.75 48.3 0 top
R835  0R/1%  [R0402S]  19.75 47.4 0 top
R836  100R/1%  [R0402S]  34.85 123.55 180 top
R837  100K/1%  [R0402S]  36.15 119.05 0 top
R838  100K/1%  [R0402S]  37.8 119.05 0 top
R839  30K/1%  [R0402S]  39.1 119.65 90 top
R842  NC/0R/1%  [R0402S]  7.15 58.6 90 bottom
R843  NC/0R/1%  [R0402S]  8.05 58.6 270 bottom
R844  0R/1%  [R0402S]  47.35 91.15 270 top
R845  0R/1%  [R0402S]  46.45 91.15 270 top
R846  0R/1%  [R0402S]  49.15 91.15 270 top
R847  0R/1%  [R0402S]  48.25 91.15 270 top
R848  0R/1%  [R0402S]  45.55 91.15 270 top
R849  0R/1%  [R0402S]  44.65 91.15 270 top
R850  0R/1%  [R0402S]  47.35 87.2 270 bottom
R851  0R/1%  [R0402S]  46.45 87.2 270 bottom
R852  0R/1%  [R0402S]  49.15 87.2 270 bottom
R853  0R/1%  [R0402S]  48.25 87.2 270 bottom
R854  0R/1%  [R0402S]  45.55 87.2 270 bottom
R855  0R/1%  [R0402S]  44.65 87.2 270 bottom
R856  NC/0R/1%  [R0402S]  82.3 99.95 0 bottom
R857  0R/1%  [R0402S]  82.3 99.05 0 bottom
R858  0R/1%  [R0402S]  55.35 62.95 90 top
R859  0R/1%  [R0402S]  49.65 61.85 0 top
R860  NC/0R/1%  [R0402S]  10.3 35.7 180 top
RV1  LP16-500F  [PTC_LP16-500F_THT]  82.4 118.3 270 top
S1  SW 2  [SW2_EP-02KS_1P27]  81.1 132.2 90 top
S2  SW 2  [SW2_EP-02KS_1P27]  11.7 90.4 90 top
S3  SW 2  [SW2_EP-02KS_1P27]  11.7 84.8 90 top
S4  SW 4  [SW4_EP-04KS_1P27]  73.05 65.85 270 top
S5  SW 8  [SW8_EP-08KS_1P27]  46.3 39.4 270 top
S6  SW 8  [SW8_EP-08KS_1P27]  61.8 39.4 270 top
S7  SW 2  [SW2_EP-02KS_1P27]  61.8 30.5 270 top
S8  SW 8  [SW8_EP-08KS_1P27]  59 48.7 90 bottom
S9  SW 4  [SW4_EP-04KS_1P27]  74.7 55.5 90 bottom
S10  SW 4  [SW4_EP-04KS_1P27]  77 22.9 0 top
S11  SW 4  [SW4_EP-04KS_1P27]  74.7 47 90 bottom
S12  SW 2  [SW2_EP-02KS_1P27]  67.8 22.8 0 top
S13  SW 8  [SW8_EP-08KS_1P27]  74.7 36.2 90 bottom
